# Altium PCB Mach_dk.PcbDoc
Units mm, origin at the board's own origin, x right, y up, seen from the top; angles counter-clockwise.
Board outline 90.04 x 73.02 mm, 2 copper layers (Top Layer, Bottom Layer); 94 components, 80 nets, 252 pads, 4 vias.
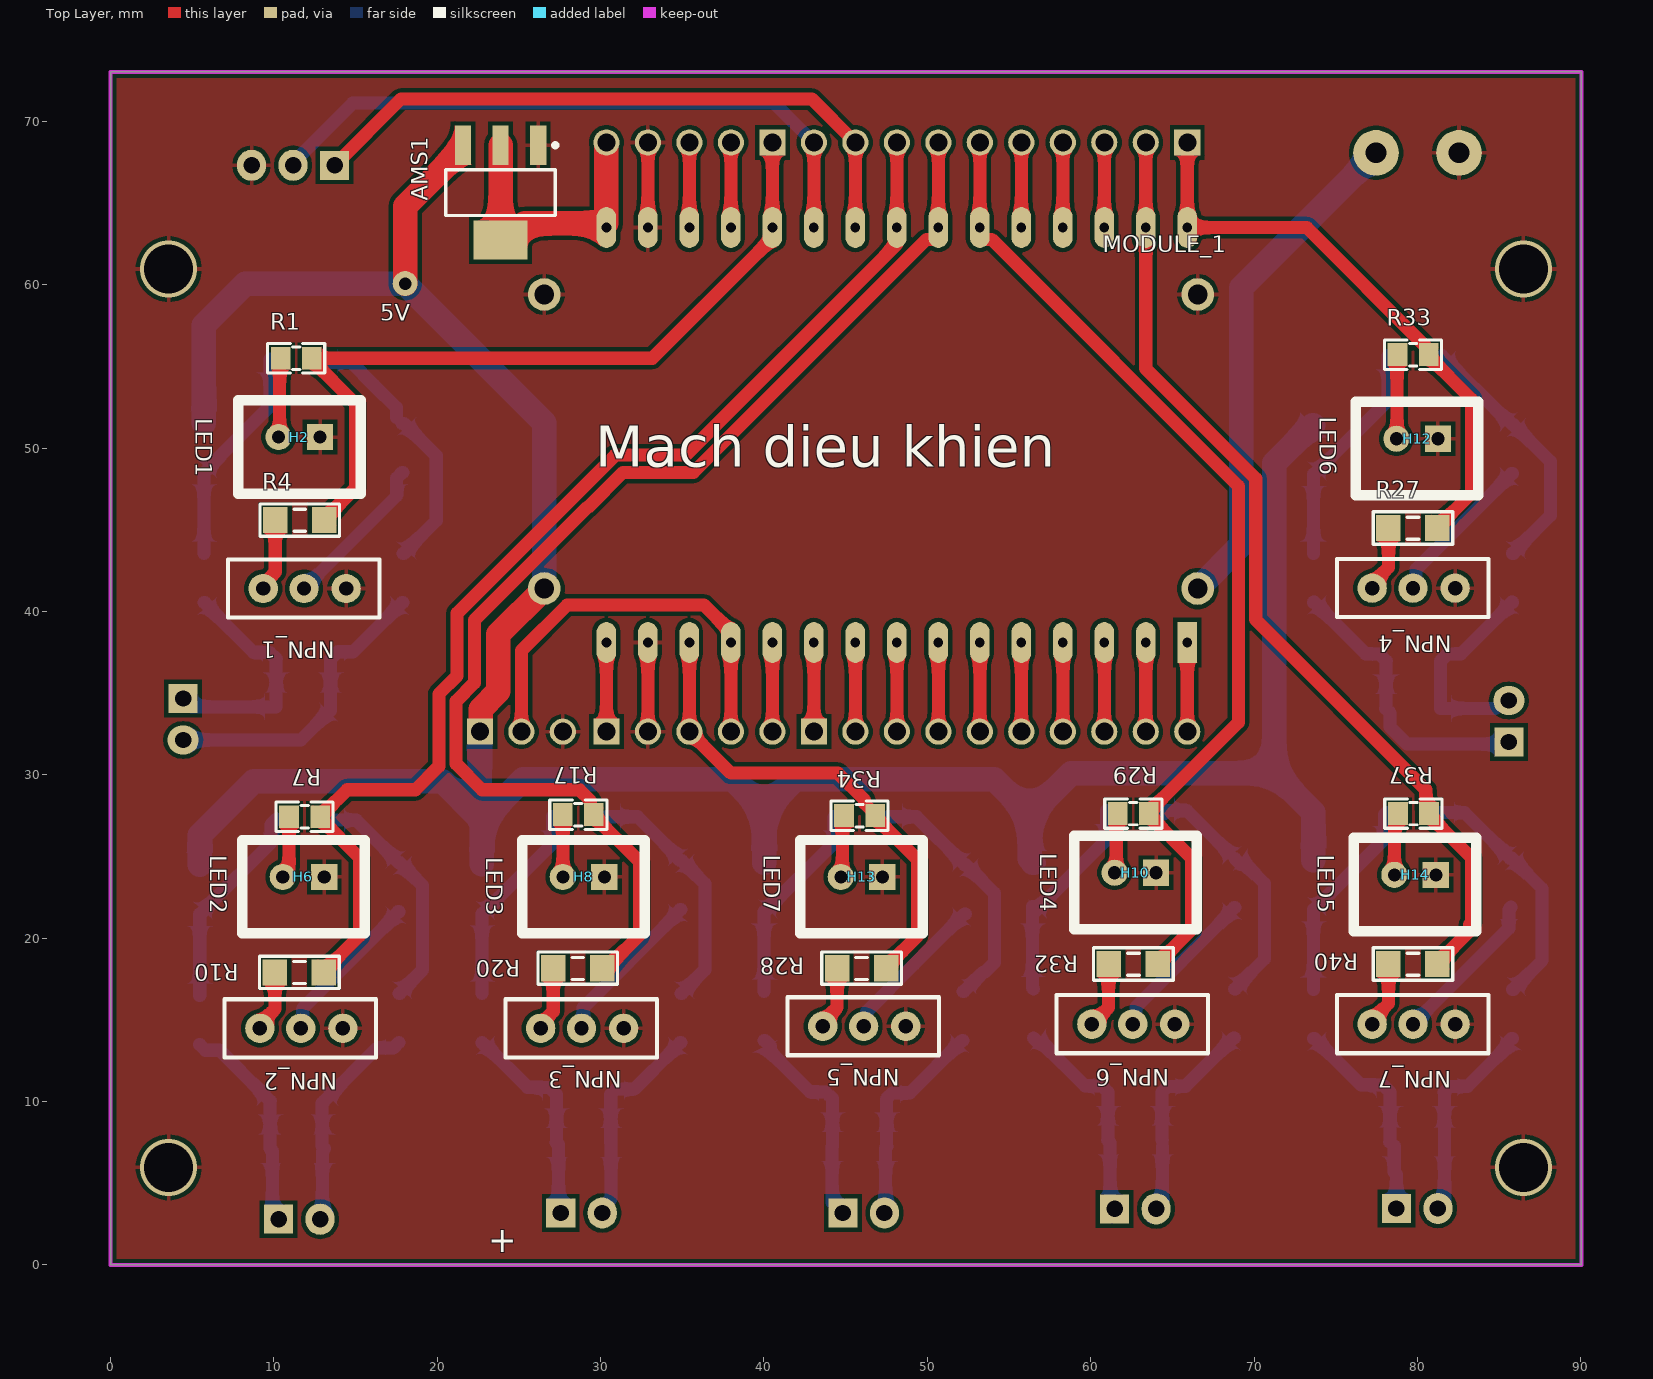
[diagram p0: Top Layer view]
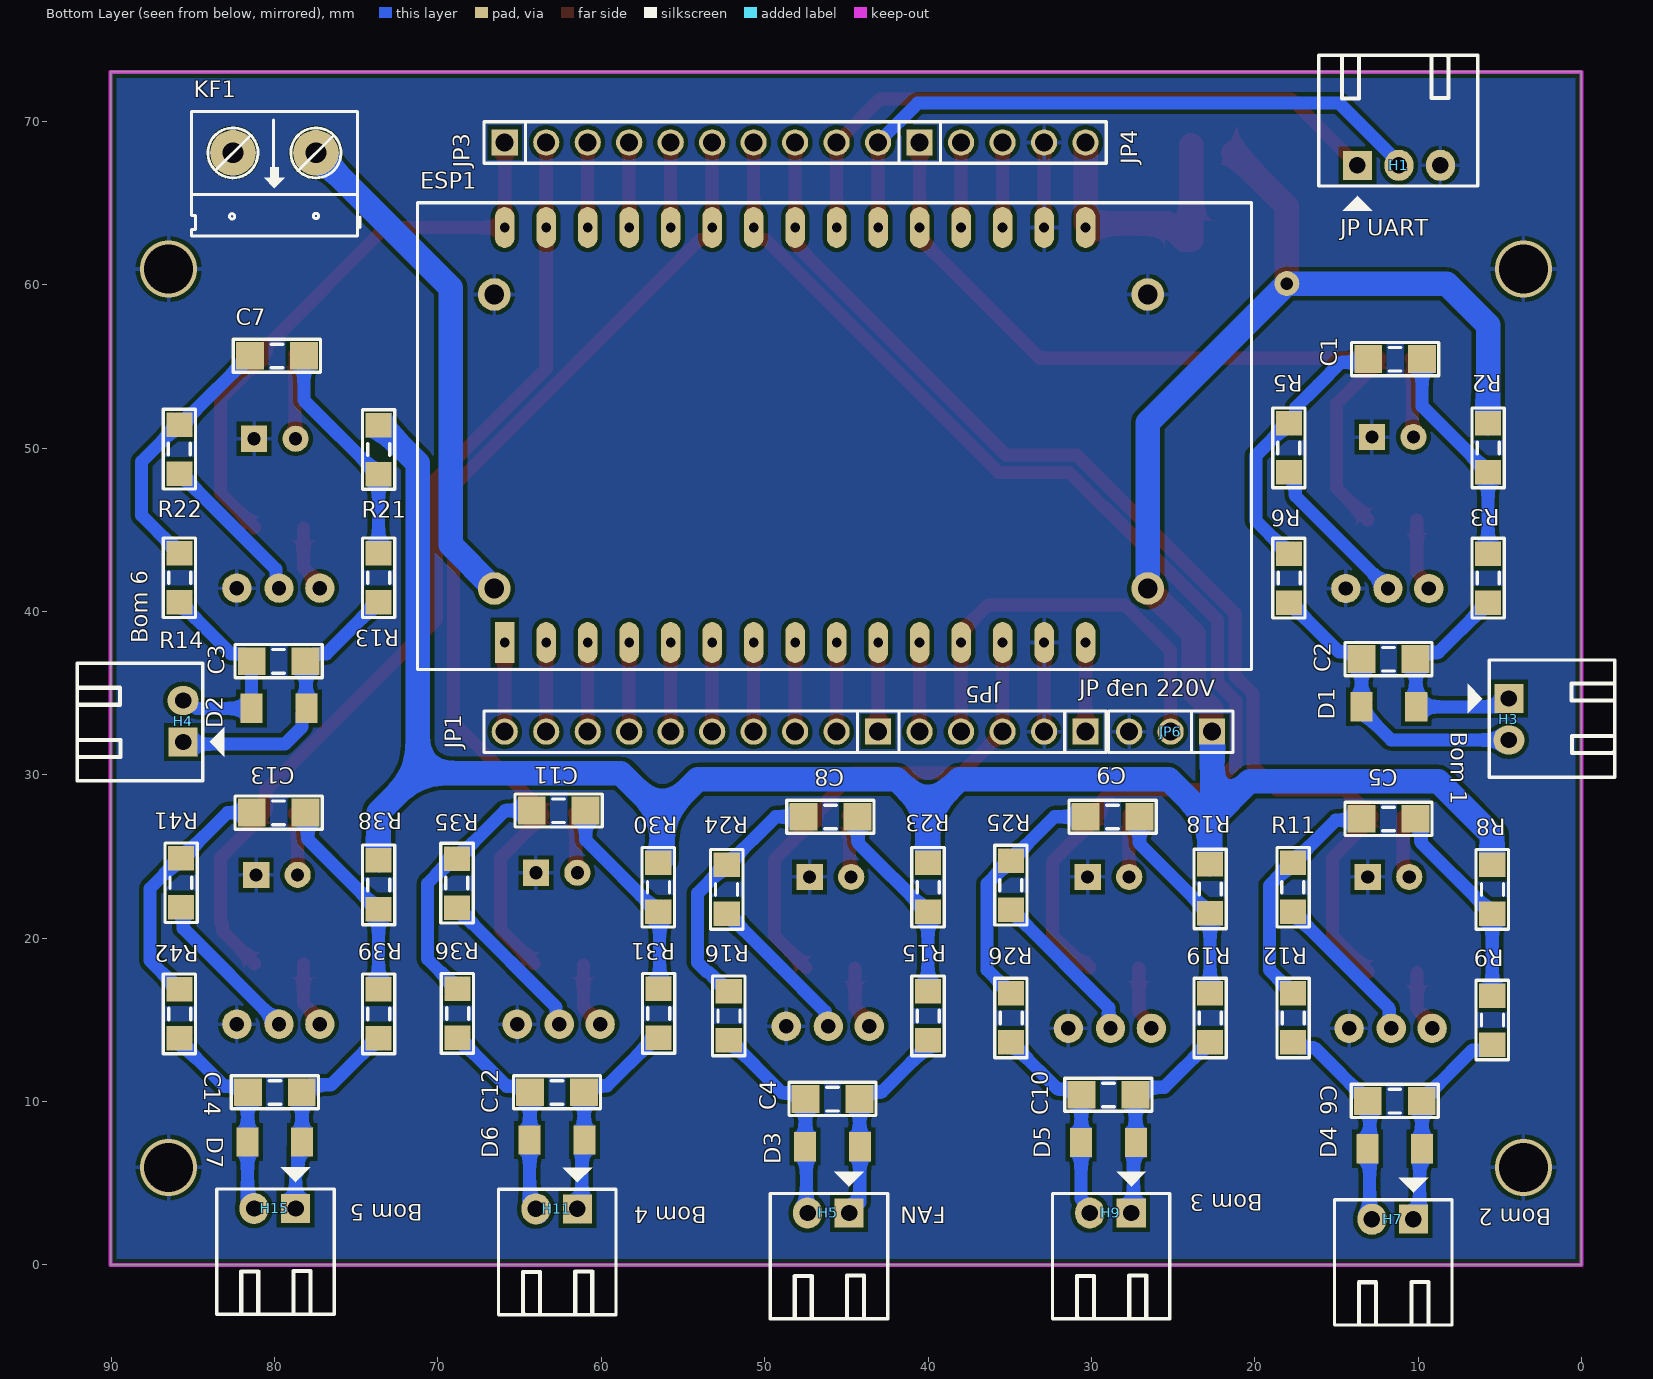
[diagram p1: Bottom Layer view, seen from below]
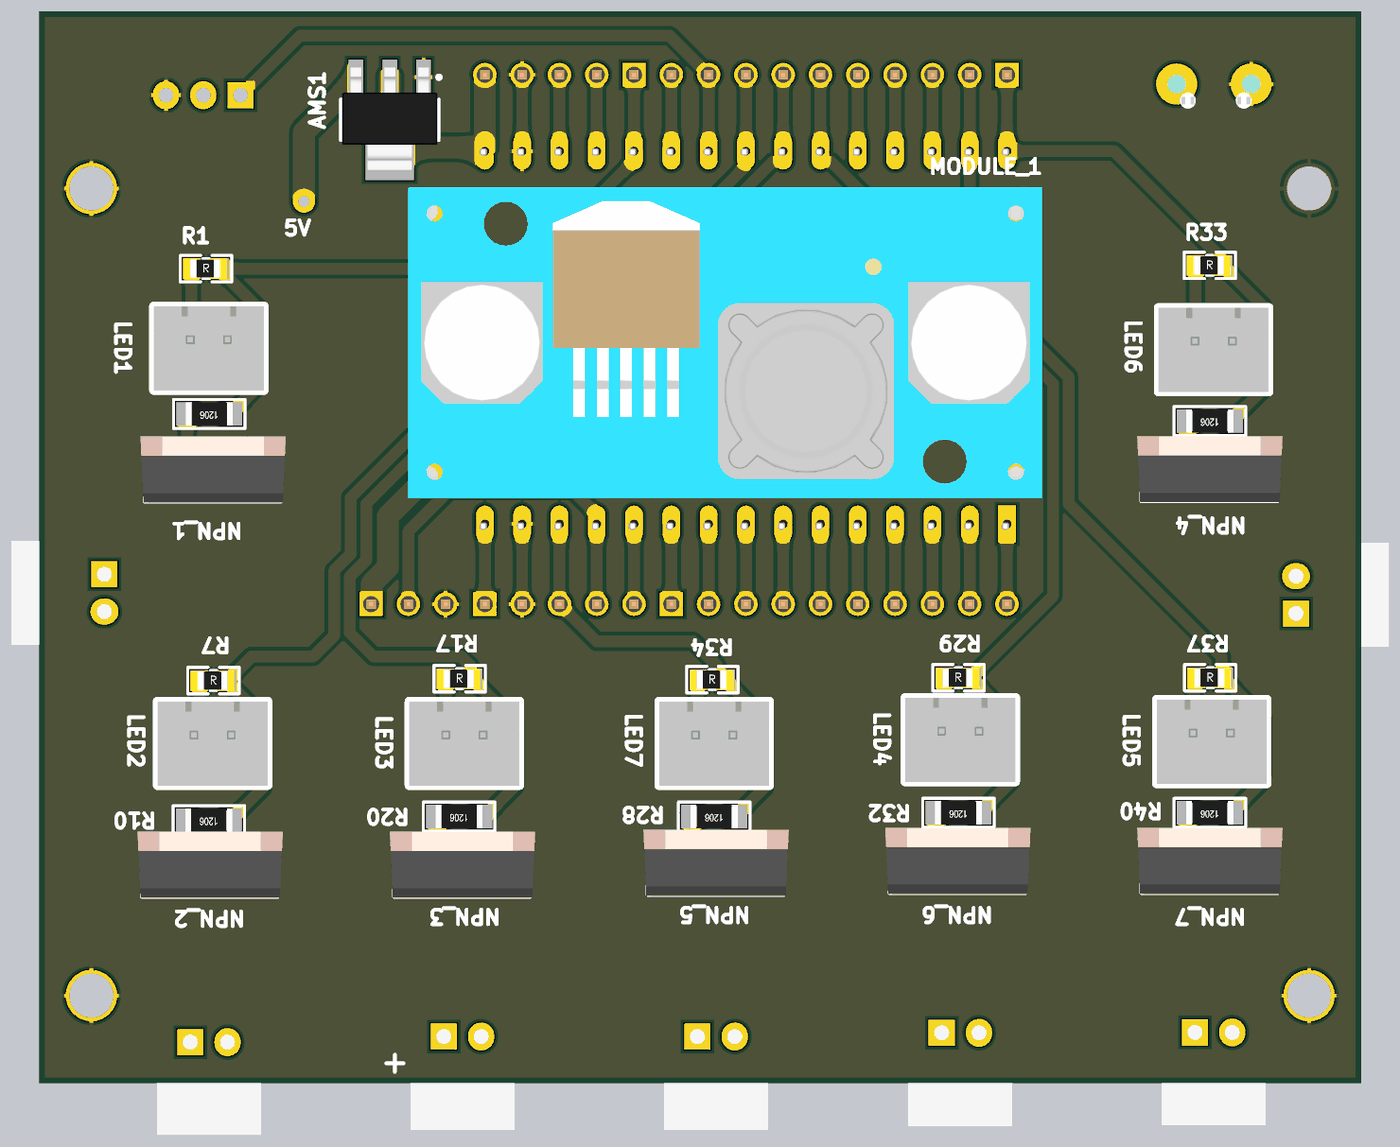
[diagram p2: 3D render of the assembled board from above, using the file's embedded part models]
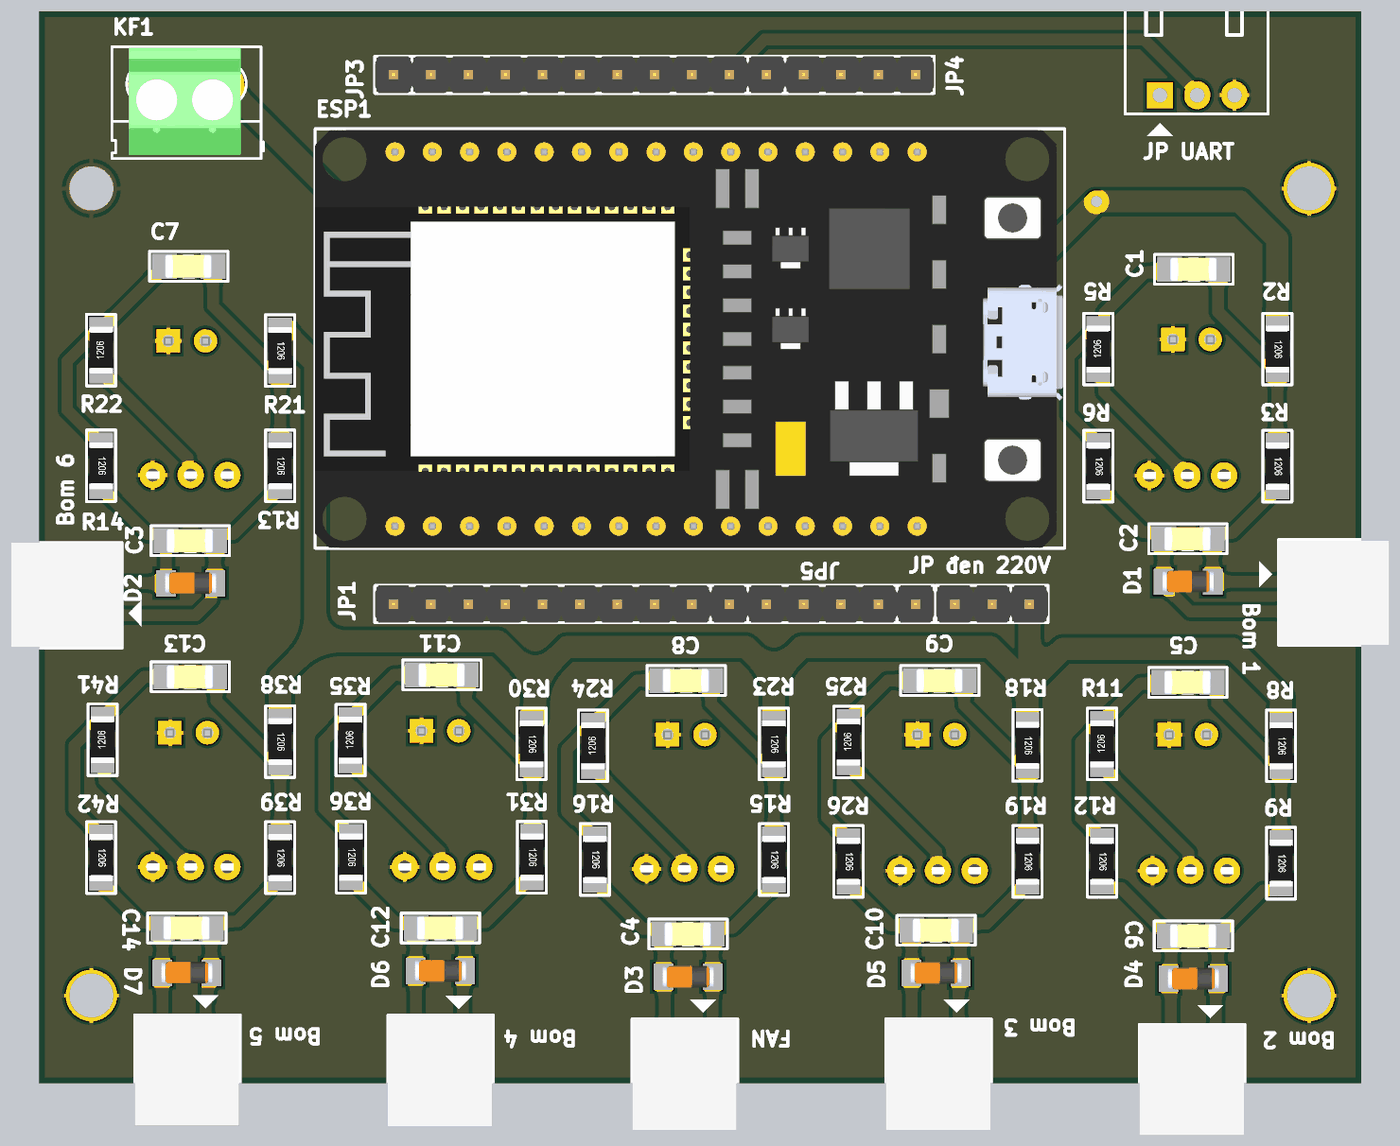
[diagram p3: 3D render of the assembled board from below, using the file's embedded part models]

## Layer stack, top to bottom
Top Solder: solder mask 0.0102, Solder Resist, Dk 3.5
Top Layer: signal copper 0.0356
Dielectric 1: dielectric 0.32, FR-4, Dk 4.8
Bottom Layer: signal copper 0.0356
Bottom Solder: solder mask 0.0102, Solder Resist, Dk 3.5

## Board outline
0,0 0,73.025 90.043,73.025 90.043,0

## Design rules (kind name [scope] priority, off if disabled: settings)
Clearance [All] p1: gap=0.254 ignorepadtopadclearanceinfootprint=FALSE
PolygonConnect [All] p1: connectstyle=Relief reliefconductorwidth=0.254 reliefentries=4 polygonreliefangle="90 Angle" airgapwidth=0.254
RoomDefinition Mach_sche [InComponentClass('Mach_sche')] p1: confinementstyle=ConfineIn formatcopy=TRUE lockcomponents=FALSE outline -5.842,-2.286 96.393,-2.286 96.393,74.041 -5.842,74.041
RoutingVias [All] p1: holewidth=0.711 width=1.27 viastyle="Through Hole" minholewidth=0.711 minwidth=1.27 maxholewidth=0.711 maxwidth=1.27
SolderMaskExpansion [All] p1: expansion=0.102 istentingtop=FALSE
Width 12V [InNet('12V')] p1: maxlimit=1.5 minlimit=0.5 preferedwidth=1
Width 5V [InNet('5V')] p2: maxlimit=1.5 minlimit=0.5 preferedwidth=1
Width 3V3 [InNet('3V3')] p3: maxlimit=1.5 minlimit=0.5 preferedwidth=1
Width all [All] p4: maxlimit=0.8 minlimit=0.3 preferedwidth=0.5
30 further rules are at their usual default settings.

## Components (designator, comment, footprint, x,y, rotation, side; value= is the part's Value field where it differs from the comment)
AMS1 "AMS1117-3.3V" SOT223 23.876,65.638 r180 top value="AMS1117-3.3V SOT223"
C1 "104" "tu 1206" 11.403,55.448 r0 bottom
C2 "104" "tu 1206" 11.812,37.084 r0 bottom
C3 "104" "tu 1206" 79.756,36.957 r0 bottom
C4 "104" "tu 1206" 45.847,10.16 r0 bottom
C5 "104" "tu 1206" 11.812,27.305 r0 bottom
C6 "104" "tu 1206" 11.43,10.033 r0 bottom
C7 "104" "tu 1206" 79.858,55.651 r0 bottom
C8 "104" "tu 1206" 45.975,27.432 r0 bottom
C9 "104" "tu 1206" 28.703,27.432 r0 bottom
C10 "104" "tu 1206" 28.956,10.414 r0 bottom
C11 "104" "tu 1206" 62.611,27.813 r0 bottom
C12 "104" "tu 1206" 62.713,10.566 r0 bottom
C13 "104" "tu 1206" 79.756,27.686 r0 bottom
C14 "104" "tu 1206" 79.985,10.566 r0 bottom
D1 "12V" "DIODE ZENNER SMD SOD80" 11.787,34.163 r0 bottom
D2 "12V" "DIODE ZENNER SMD SOD80" 79.731,34.061 r0 bottom
D3 "12V" "DIODE ZENNER SMD SOD80" 45.847,7.239 r0 bottom
D4 "12V" "DIODE ZENNER SMD SOD80" 11.43,7.112 r0 bottom
D5 "12V" "DIODE ZENNER SMD SOD80" 28.956,7.493 r0 bottom
D6 "12V" "DIODE ZENNER SMD SOD80" 62.713,7.645 r0 bottom
D7 "12V" "DIODE ZENNER SMD SOD80" 79.985,7.518 r0 bottom
ESP1 "ESP32 DEVKIT" "ESP32 WROOM 32 KIT" 65.913,38.1 r90 bottom
H1 "JP UART" "Header 3P DC 2.54" 13.716,67.31 r90 bottom
H2 "LED1" XH2.54M-2 12.827,50.673 r180 top
H3 "Bom 1" "Header 2P DC 2.54" 4.445,34.671 r180 bottom
H4 "Bom 6" "Header 2P DC 2.54" 85.598,32.004 r0 bottom
H5 "FAN" "Header 2P DC 2.54" 44.831,3.175 r270 bottom
H6 "LED2" XH2.54M-2 13.081,23.749 r180 top
H7 "Bom 2" "Header 2P DC 2.54" 10.287,2.794 r270 bottom
H8 "LED3" XH2.54M-2 30.226,23.749 r180 top
H9 "Bom 3" "Header 2P DC 2.54" 27.559,3.175 r270 bottom
H10 "LED4" XH2.54M-2 64.008,24.003 r180 top
H11 "Bom 4" "Header 2P DC 2.54" 61.468,3.429 r270 bottom
H12 "LED6" XH2.54M-2 81.255,50.571 r180 top
H13 "LED7" XH2.54M-2 47.244,23.749 r180 top
H14 "LED5" XH2.54M-2 81.128,23.876 r180 top
H15 "Bom 5" "Header 2P DC 2.54" 78.715,3.454 r270 bottom
JP1 "JP 1x10 2.54" "JP 1x10 DT" 43.053,32.639 r0 bottom
JP3 "JP 1x10 2.54" "JP 1x10 DT" 65.913,68.707 r180 bottom
JP4 "JP 1x5 2.54" "JP 1x5 DT" 40.513,68.707 r180 bottom
JP5 "JP 1x5 2.54" "JP 1x5 DT" 30.353,32.639 r0 bottom
JP6 "JP đen 220V" "JP 1x3 DT" 22.606,32.639 r0 bottom
KF1 "CON 2 KF301" "Con 2 KF301 5.08" 77.47,68.072 r0 bottom
MODULE_1 "LM2596HVS_MODULE" LM2596HVS_MODULE 66.548,59.402 r270 top
NPN_1 "Trans 2SD882M SOT-252" Trans_2SD882_DIP 9.343,41.402 r0 top
NPN_2 "Trans 2SD882M SOT-252" Trans_2SD882_DIP 9.144,14.478 r0 top
NPN_3 "Trans 2SD882M SOT-252" Trans_2SD882_DIP 26.329,14.478 r0 top
NPN_4 "Trans 2SD882M SOT-252" Trans_2SD882_DIP 77.231,41.427 r0 top
NPN_5 "Trans 2SD882M SOT-252" Trans_2SD882_DIP 43.601,14.605 r0 top
NPN_6 "Trans 2SD882M SOT-252" Trans_2SD882_DIP 60.071,14.732 r0 top
NPN_7 "Trans 2SD882M SOT-252" Trans_2SD882_DIP 77.231,14.732 r0 top
R1 "330R" "Tro SMD 0805" 11.365,55.56 r0 top
R2 "L3" "tro smd 1206" 5.715,50.014 r270 bottom
R3 "L4" "tro smd 1206" 5.715,42.037 r270 bottom
R4 "100R" "tro smd 1206" 11.581,45.593 r180 top
R5 "L6" "tro smd 1206" 17.907,50.014 r90 bottom
R6 "L7" "tro smd 1206" 17.907,42.037 r270 bottom
R7 "330R" "Tro SMD 0805" 11.873,27.493 r0 top
R8 "L3" "tro smd 1206" 5.461,22.987 r270 bottom
R9 "L4" "tro smd 1206" 5.461,14.986 r270 bottom
R10 "100R" "tro smd 1206" 11.557,17.907 r180 top
R11 "L6" "tro smd 1206" 17.653,23.114 r90 bottom
R12 "L7" "tro smd 1206" 17.653,15.113 r270 bottom
R13 "L4" "tro smd 1206" 73.635,42.062 r270 bottom
R14 "L7" "tro smd 1206" 85.827,42.062 r270 bottom
R15 "L4" "tro smd 1206" 40.005,15.24 r270 bottom
R16 "L7" "tro smd 1206" 52.197,15.24 r270 bottom
R17 "330R" "Tro SMD 0805" 28.637,27.62 r0 top
R18 "L3" "tro smd 1206" 22.733,23.011 r270 bottom
R19 "L4" "tro smd 1206" 22.733,15.113 r270 bottom
R20 "100R" "tro smd 1206" 28.599,18.161 r180 top
R21 "L3" "tro smd 1206" 73.635,49.912 r270 bottom
R22 "L6" "tro smd 1206" 85.827,49.936 r90 bottom
R23 "L3" "tro smd 1206" 40.005,23.114 r270 bottom
R24 "L6" "tro smd 1206" 52.324,22.987 r90 bottom
R25 "L6" "tro smd 1206" 34.925,23.241 r90 bottom
R26 "L7" "tro smd 1206" 34.925,15.113 r270 bottom
R27 "100R" "tro smd 1206" 79.731,45.11 r180 top
R28 "100R" "tro smd 1206" 45.974,18.161 r180 top
R29 "330R" "Tro SMD 0805" 62.611,27.686 r0 top
R30 "L3" "tro smd 1206" 56.515,23.114 r270 bottom
R31 "L4" "tro smd 1206" 56.49,15.392 r270 bottom
R32 "100R" "tro smd 1206" 62.611,18.415 r180 top
R33 "330R" "Tro SMD 0805" 79.731,55.778 r0 top
R34 "330R" "Tro SMD 0805" 45.847,27.559 r0 top
R35 "L6" "tro smd 1206" 68.834,23.368 r90 bottom
R36 "L7" "tro smd 1206" 68.809,15.392 r270 bottom
R37 "330R" "Tro SMD 0805" 79.756,27.686 r0 top
R38 "L3" "tro smd 1206" 73.635,23.265 r270 bottom
R39 "L4" "tro smd 1206" 73.635,15.367 r270 bottom
R40 "100R" "tro smd 1206" 79.731,18.415 r180 top
R41 "L6" "tro smd 1206" 85.725,23.392 r90 bottom
R42 "L7" "tro smd 1206" 85.827,15.367 r270 bottom

## Footprints (in the part's own frame and the unit in brackets; to place one, negate y for a bottom-side part, rotate by r counter-clockwise, add the part's x,y. Pads: shape width x height; smd on the part's side, far side on the other; paste and mask are expansions set on the pad)
"Con 2 KF301 5.08" [mil]
  round 110 hole 50: 1(0,0) 2(200,0)
  silkscreen extent -106,-100 300,200, body extent -45,-97 255,190, height 335
"DIODE ZENNER SMD SOD80" [mm] "SOD80"
  rect 1.35x1.8 smd: 1(1.675,0) 2(-1.675,0)
  body extent -1.75,-0.76 1.75,0.74, height 1.45
"ESP32 WROOM 32 KIT" [mm]
  rect 2.5x1.2 hole 0.6: 1(0,0)
  oval 2.5x1.2 hole 0.6: 2(0,-2.54) 3(0,-5.08) 4(0,-7.62) 5(0,-10.16) 6(0,-12.7) 7(0,-15.24) 8(0,-17.78) 9(0,-20.32) 10(0,-22.86) 11(0,-25.4) 12(0,-27.94) 13(0,-30.48) 14(0,-33.02) 15(0,-35.56) 16(25.4,-35.56) 17(25.4,-33.02) 18(25.4,-30.48) 19(25.4,-27.94) 20(25.4,-25.4) 21(25.4,-22.86) 22(25.4,-20.32) 23(25.4,-17.78) 24(25.4,-15.24) 25(25.4,-12.7) 26(25.4,-10.16) 27(25.4,-7.62) 28(25.4,-5.08) 29(25.4,-2.54) 30(25.4,0)
  silkscreen extent -1.65,-45.72 26.92,5.33, body extent -1.65,-45.6 26.85,5.33, height 10.49
"Header 2P DC 2.54" [mil]
  rect 70x70 hole 39.37: 1(0,0)
  oval 75x70 hole 39.37: 2(0,-100)
  silkscreen extent -100,-190 255,93, body extent -50,-190 250,90, height 237
"Header 3P DC 2.54" [mil]
  rect 70x70 hole 39.37: 1(0,0)
  oval 75x70 hole 39.37: 2(0,-100) 3(0,-200)
  silkscreen extent -110,-290 265,93
"JP 1x3 DT" [mm]
  rect 1.6x1.6 hole 1.1: 1(0,0)
  round 1.6 hole 1.1: 2(2.54,0) 3(5.08,0)
  silkscreen extent -1.27,-1.27 6.35,1.27, body extent -1.27,-1.27 6.35,1.27, height 8.54
"JP 1x5 DT" [mm] "5 pins, 1 row, straight, gold plating"
  rect 1.6x1.6 hole 1.1: 1(0,0)
  round 1.6 hole 1.1: 2(2.54,0) 3(5.08,0) 4(7.62,0) 5(10.16,0)
  silkscreen extent -1.27,-1.27 11.43,1.27, body extent -1.27,-1.27 11.43,1.27, height 8.54
"JP 1x10 DT" [mm] "10 pins, 1 row, straight, gold plating"
  rect 1.6x1.6 hole 1.1: 1(0,0)
  round 1.6 hole 1.1: 2(2.54,0) 3(5.08,0) 4(7.62,0) 5(10.16,0) 6(12.7,0) 7(15.24,0) 8(17.78,0) 9(20.32,0) 10(22.86,0)
  silkscreen extent -1.27,-1.27 24.13,1.27, body extent -1.27,-1.27 24.13,1.27, height 8.54
LM2596HVS_MODULE [mm]
  round 2 hole 1.2: 1(0,0) 2(18,0) 3(0,-40) 4(18,-40)
  body extent -1.65,-41.42 19.55,1.78, height 13.5
SOT223 [mm]
  rect 1x2.4 smd: 1(-2.3,-2.9) 2(0,-2.9) 3(2.3,-2.9)
  rect 3.3x2.4 smd: 4(0,2.9)
  silkscreen extent -3.48,-3.02 3.35,1.4, body extent -3.25,-3.56 3.25,3.4, height 1.68
Trans_2SD882_DIP [mm]
  round 1.8 hole 0.88: 1(0,0) 2(2.5,0) 3(5.08,0)
  silkscreen extent -2.16,-1.78 7.11,1.78, body extent -2.45,-1.85 7.45,2.65, height 24.1
"Tro SMD 0805" [mm]
  rect 1.2x1.4 smd: 1(-0.946,-0.061) 2(0.954,-0.061)
  silkscreen extent -1.75,-0.97 1.75,0.84, body extent -1.56,-0.76 1.44,0.64, height 0.53
"tro smd 1206" [mm]
  rect 1.5x1.6 smd: 1(-1.5,0) 2(1.5,0)
  silkscreen extent -2.44,-0.99 2.44,0.99, body extent -1.6,-0.8 1.6,0.8, height 0.6
"tu 1206" [mm]
  rect 1.7x1.7 smd: 1(-1.65,0) 2(1.65,0)
  silkscreen extent -2.67,-1.02 2.67,1.02, body extent -1.57,-0.8 1.63,0.8, height 0.94
XH2.54M-2 [mm]
  rect 1.6x1.6 hole 0.8: 1(0,0)
  round 1.6 hole 0.8: 2(2.54,0)
  silkscreen extent -2.48,-2.26 5.02,3.46, body extent -2.48,-2.26 5.02,3.48, height 6.91

## Part data
AMS1: library part "AMS1117 SMD", "Dán", Chung_Loai=Dán, Don_Vi=Con, Ma_Hang=MH000596
C1 C2 C3 C4 C5 C6 C7 C8 C9 C10 C11 C12 C13 C14: library part "Tu 1206 104 50V 20%", "Dán", Chung_Loai=Dán, Don_Vi=Con, Ma_Hang=MH004544, So_Chan=2, Ten_Linh_Kien="Tụ 1206 104-0.1uF 20% 50V"
D1 D2 D3 D4 D5 D6 D7: library part "Diode Zener 12V", "Dán", Chung_Loai=Dán, Don_Vi=Con, Ma_Hang=MH000945, Ten_Linh_Kien="Diode Zener 1/2W 12V SMD1206 ZMM12"
ESP1: library part "ESP32 WROOM 32 KIT"
H1: library part "Header 3P 2.54 Duc Cong", "Cắm", Chung_Loai=Cắm, Don_Vi=Con, Ma_Hang=MH001302, Ten_Linh_Kien="Header 3P XH2.54-3P Đực Cong"
H2 H6 H8 H10 H12 H13 H14: library part "Header 2P 2.54 Duc Thang", "Cắm", Chung_Loai=Cắm, Don_Vi=Con, Ma_Hang=MH001283, Ten_Linh_Kien="Header 2P XH2.54-2P Đực Thẳng"
H3 H4 H5 H7 H9 H11 H15: library part "Header 2P 2.54 Duc Cong", "Cắm", Chung_Loai=Cắm, Don_Vi=Con, Ma_Hang=MH002852, Ten_Linh_Kien="Header 2P XH2.54-2P Đực Cong"
JP1 JP3: library part "JP 1x10 2.54 Duc Thang", "Cắm", Chung_Loai=Cắm, Don_Vi=Con, Ma_Hang=MH000903, Ten_Linh_Kien="Jump Đơn Đực 2.54MM 1x40P Thẳng 11MM"
JP4 JP5: library part "JP 1x5 2.54 Duc Thang", "Cắm", Chung_Loai=Cắm, Don_Vi=Con, Ma_Hang=MH000903, Ten_Linh_Kien="Jump Đơn Đực 2.54MM 1x40P Thẳng 11MM"
JP6: library part "JP 1x3 2.54 Duc Thang", "Cắm", Chung_Loai=Cắm, Don_Vi=Con, Ma_Hang=MH000903, Ten_Linh_Kien="Jump Đơn Đực 2.54MM 1x40P Thẳng 11MM"
KF1: "Cắm", Chung_Loai=Cắm, Don_Vi=Con, Ma_Hang=MH000987, Ten_Linh_Kien="CON 2 KF301-2P 5.08MM Xanh Dương"
R1 R7 R17 R29 R33 R34 R37: library part "Tro 0805 5% 330R", "Dán", Chung_Loai=Dán, Don_Vi=Con, Ma_Hang=MH005337, So_Chan=2, Ten_Linh_Kien="Trở 0805 5% 330R"
R2 R3 R5 R6 R8 R9 R11 R12 R13 R14 R15 R16 R18 R19 R21 R22 R23 R24 R25 R26 R30 R31 R35 R36 R38 R39 R41 R42: library part "Tro 1206 1% 200R", "Dán", Chung_Loai=Dán, Don_Vi=Con, Ma_Hang=MH005895, So_Chan=2, Ten_Linh_Kien="Trở 1206 1% 200R"
R4 R10 R20 R27 R28 R32 R40: library part "Tro 1206 1% 100R", "Dán", Chung_Loai=Dán, Don_Vi=Con, Ma_Hang=MH005891, So_Chan=2, Ten_Linh_Kien="Trở 1206 1% 100R"

## Free pads (board coordinates)
  round 1.524 hole 0.762: ""(18.034,60.071)

## Via types
v1: diameter 3.5, hole 3, Top Layer to Bottom Layer, 3 vias
v2: diameter 3.5, hole 3, Top Layer to Bottom Layer, tented both sides, 1 vias

## Nets (pads, with @x,y where several pads share a name; then routed paths per layer and width w, separated by ;. In a path a pad name is that pad's centre, name@x,y a point inside that pad or via, vN(x,y) a via of type N, cw(c..) or ccw(c..) an arc to the next point about the centre after c; other vN are vias at no path point)
3V3: AMS1.2 AMS1.4 ESP1.16 JP4.5 | length 17.7
  Top Layer w1.5: AMS1.2 AMS1.4 24.326,62.738 25.342,63.754 30.353,63.754 JP4.5
5V: AMS1.3 JP6.1 MODULE_1.4 pad. R2.1 R8.1 R18.1 R21.1 R23.1 R30.1 R38.1 | length 179
  Top Layer w1.5: pad. 18.034,64.796 AMS1.3@21.326,68.088 ; JP6.1 22.656,32.689 22.656,34.026 23.742,35.112 23.742,38.596 MODULE_1.4
  Bottom Layer w1.5: R8.1 5.461,26.299 7.874,28.712 8.753,29.591 20.32,29.591 22.606,27.305 ; R2.1 5.715,57.531 8.255,60.071 pad. 26.548,51.557 MODULE_1.4 ; 22.606,27.178 22.606,27.305 ; JP6.1 22.606,27.305 ; R18.1 22.733,27.178 ; R23.1 40.005,27.813 ; R30.1 56.465,24.614 56.465,24.664 56.261,24.868 56.261,27.559 ; R38.1 73.635,27.711 71.247,30.099 ; R21.1 73.585,51.412 71.247,49.075 71.247,30.099 ; 22.606,27.305 22.733,27.178 ; 22.733,27.178 25.273,29.718 38.1,29.718 40.005,27.813 ; 40.005,27.813 41.91,29.718 54.102,29.718 56.261,27.559 ; 56.261,27.559 58.801,30.099 71.247,30.099
12V: KF1.1 MODULE_1.2 | length 31.2
  Bottom Layer w1.5: MODULE_1.2 69.215,44.069 69.215,59.817 KF1.1
D2: ESP1.19 JP4.2 | length 5
  Top Layer w0.8: ESP1.19@37.973,63.754 JP4.2
D4: ESP1.20 JP4.1 R1.2 R4.1 | length 48.6
  Top Layer w0.8: R4.1 13.081,45.643 14.986,47.548 14.986,52.732 12.319,55.399 R1.2 33.162,55.499 40.513,62.85 ESP1.20 ; ESP1.20@40.513,63.754 JP4.1
D5: ESP1.23 JP3.8 R7.2 R10.1 | length 72.1
  Top Layer w0.8: R10.1 13.057,17.957 15.24,20.14 15.24,24.919 12.827,27.332 12.827,27.532 13.027,27.732 13.127,27.732 14.478,29.083 18.669,29.083 20.098,30.512 20.098,34.944 21.216,36.062 21.216,39.9 30.884,49.568 35.217,49.568 48.056,62.407 48.056,63.423 ESP1.23 ; ESP1.23@48.133,63.754 JP3.8
D12: ESP1.12 JP5.4 JP6.2 | length 25.7
  Top Layer w0.8: JP6.2 25.146,37.592 27.94,40.386 36.337,40.386 37.973,38.75 ESP1.12 JP5.4
D13: ESP1.13 JP5.3 R28.1 R34.2 | length 30.5
  Top Layer w0.8: ESP1.13@35.433,38.227 ESP1.13 JP5.3 37.973,30.099 44.526,30.099 46.155,28.469 46.155,28.244 46.801,27.598 R34.2 46.801,27.398 49.403,24.797 49.403,20.14 47.474,18.211 R28.1
D14: ESP1.11 JP5.5 | length 5.6
  Top Layer w0.8: JP5.5 ESP1.11@40.513,38.227
D15: ESP1.18 JP4.3 | length 5
  Top Layer w0.8: ESP1.18@35.433,63.754 JP4.3
D18: ESP1.24 JP3.7 R17.2 R20.1 | length 74.8
  Top Layer w0.8: R20.1 30.099,18.211 30.449,18.561 30.753,18.561 32.385,20.193 32.385,24.665 29.591,27.459 R17.2 29.391,27.759 29.391,28.394 28.702,29.083 22.739,29.083 21.152,30.67 21.152,34.507 22.27,35.625 22.27,39.463 29.162,46.355 29.21,46.355 31.369,48.514 35.687,48.514 49.946,62.773 50.488,62.773 50.673,62.958 ESP1.24 ; ESP1.24@50.673,63.627 JP3.7
D19: ESP1.25 JP3.6 R29.2 R32.1 | length 61
  Top Layer w0.8: ESP1.25 53.213,62.958 53.398,62.773 53.94,62.773 69.05,47.663 69.05,33.21 R29.2@63.692,27.852 ; ESP1.25@53.213,63.627 JP3.6 ; R29.2 63.565,27.525 63.692,27.398 66.167,24.924 66.167,20.521 64.111,18.465 R32.1
D21: ESP1.26 JP3.5 | length 5
  Top Layer w0.8: ESP1.26@55.753,63.754 JP3.5
D22: ESP1.29 JP3.2 R37.2 R40.1 | length 59.2
  Top Layer w0.8: ESP1.29 63.373,54.864 70.104,48.133 70.104,39.497 80.51,29.091 80.51,27.825 R37.2 80.71,27.525 83.312,24.924 83.312,20.955 83.185,20.828 83.185,20.419 81.231,18.465 R40.1 ; ESP1.29@63.373,63.754 JP3.2
D23: ESP1.30 JP3.1 R27.1 R33.2 | length 36.9
  Top Layer w0.8: ESP1.30 65.913,63.05 66.098,62.865 66.098,63.5 73.228,63.5 80.485,56.243 80.485,55.918 R33.2 80.685,55.618 83.312,52.991 83.312,47.242 81.231,45.16 R27.1 ; ESP1.30@65.913,63.754 JP3.1
D25: ESP1.8 JP1.3 | length 5.6
  Top Layer w0.8: JP1.3 ESP1.8@48.133,38.227
D26: ESP1.9 JP1.2 | length 5.6
  Top Layer w0.8: JP1.2 ESP1.9@45.593,38.227
D27: ESP1.10 JP1.1 | length 5.6
  Top Layer w0.8: JP1.1 ESP1.10@43.053,38.227
D32: ESP1.6 JP1.5 | length 5.6
  Top Layer w0.8: JP1.5 ESP1.6@53.213,38.227
D33: ESP1.7 JP1.4 | length 5.6
  Top Layer w0.8: JP1.4 ESP1.7@50.673,38.227
D34: ESP1.4 JP1.7 | length 5.6
  Top Layer w0.8: JP1.7 ESP1.4@58.293,38.227
D35: ESP1.5 JP1.6 | length 5.6
  Top Layer w0.8: JP1.6 ESP1.5@55.753,38.227
EN: ESP1.1 JP1.10 | length 5.6
  Top Layer w0.8: JP1.10 ESP1.1@65.913,38.227
GND: AMS1.1 ESP1.14 ESP1.17 H1.3 H2.1 H6.1 H8.1 H10.1 H12.1 H13.1 H14.1 JP4.4 JP5.2 JP6.3 KF1.2 MODULE_1.1 MODULE_1.3 NPN_1.3 NPN_2.3 NPN_3.3 NPN_4.3 NPN_5.3 NPN_6.3 NPN_7.3 | length 10.5
  Top Layer w0.8: JP5.2 ESP1.14@32.893,38.227 ; ESP1.17@32.893,63.754 JP4.4
  other v1: 3.556,5.969 86.487,5.969 3.556,60.96
  other v2: 86.487,60.96
NetC1_1: C1.1 R2.2 R3.1 | length 13.6
  Bottom Layer w0.8: R3.1 R2.2 5.765,48.514 6.115,48.864 6.115,48.914 9.753,52.552 C1.1
NetC1_2: C1.2 R5.2 R6.1 | length 16.1
  Bottom Layer w0.8: C1.2 13.256,55.245 14.732,55.245 16.12,53.857 17.507,52.47 R5.2@17.507,51.864 ; R5.2@17.857,51.514 R5.2 17.957,51.514 19.939,49.532 19.939,45.569 18.307,43.937 18.307,43.887 17.957,43.537 R6.1
NetC2_1: C2.1 D1.2 H3.1 R3.2 | length 14.5
  Bottom Layer w0.8: H3.1 4.953,34.163 D1.2 10.137,34.188 C2.1@10.137,37.109 ; R3.2 5.765,40.537 6.115,40.187 6.115,40.137 8.766,37.486 C2.1@9.76,37.486 ; C2.1@9.961,37.285 C2.1@10.137,37.109 ; C2.1 C2.1@10.137,37.109
NetC2_2: C2.2 D1.1 H3.2 R6.2 | length 18.8
  Bottom Layer w0.8: H3.2 11.655,32.131 13.462,33.938 D1.1 C2.2 13.912,37.534 14.854,37.534 17.857,40.537 R6.2
NetC3_1: C3.1 D2.2 H4.1 R13.2 | length 17.9
  Bottom Layer w0.8: R13.2 73.685,40.562 76.84,37.407 77.656,37.407 C3.1 78.081,36.932 78.081,34.087 D2.2 78.331,33.786 78.331,32.921 79.375,31.877 85.471,31.877 H4.1
NetC3_2: C3.2 D2.1 H4.2 R14.2 | length 13.2
  Bottom Layer w0.8: H4.2 85.27,34.544 84.787,34.061 D2.1 C3.2 81.856,37.407 82.671,37.407 85.427,40.162 85.427,40.212 85.777,40.562 R14.2
NetC4_1: C4.1 D3.2 H5.1 R15.2 | length 12.9
  Bottom Layer w0.8: R15.2 40.055,13.74 40.405,13.39 40.405,13.001 42.823,10.583 C4.1@43.774,10.583 ; C4.1@43.986,10.371 C4.1@44.185,10.172 ; C4.1 C4.1@44.185,10.172 ; H5.1 44.172,3.834 D3.2 44.185,7.252 C4.1@44.185,10.172
NetC4_2: C4.2 D3.1 H5.2 R16.2 | length 13.2
  Bottom Layer w0.8: H5.2 47.447,3.251 47.447,7.164 D3.1 47.51,7.251 47.51,10.147 C4.2 47.861,10.524 48.931,10.524 52.147,13.74 R16.2
NetC5_1: C5.1 R8.2 R9.1 | length 12.8
  Bottom Layer w0.8: R9.1 R8.2 5.511,21.487 5.861,21.837 5.861,21.887 9.822,25.848 9.822,26.965 C5.1
NetC5_2: C5.2 R11.2 R12.1 | length 14.6
  Bottom Layer w0.8: C5.2 13.543,27.224 15.043,27.224 R11.2 17.703,24.614 19.107,23.21 19.107,18.067 18.053,17.013 18.053,16.963 17.703,16.613 R12.1
NetC6_1: C6.1 D4.2 H7.1 R9.2 | length 13.2
  Bottom Layer w0.8: R9.2 5.811,13.136 6.677,13.136 9.33,10.483 C6.1 9.768,10.021 9.768,7.125 D4.2 9.906,6.961 9.906,3.175 H7.1
NetC6_2: C6.2 D4.1 H7.2 R12.2 | length 13.5
  Bottom Layer w0.8: H7.2 12.966,2.933 12.966,6.973 D4.1 12.954,7.263 12.954,9.907 C6.2 16.333,13.286 17.326,13.286 R12.2
NetC7_1: C7.1 R13.1 R21.2 | length 14
  Bottom Layer w0.8: R13.1 R21.2 73.685,48.412 78.208,52.935 C7.1
NetC7_2: C7.2 R14.1 R22.2 | length 15.9
  Bottom Layer w0.8: C7.2 85.373,51.786 85.477,51.786 R22.2 85.877,51.436 88.138,49.175 88.138,45.874 86.227,43.962 86.227,43.912 85.877,43.562 R14.1
NetC8_1: C8.1 R15.1 R23.2 | length 12.5
  Bottom Layer w0.8: R15.1 R23.2 40.055,21.614 44.292,25.851 44.292,27.399 C8.1
NetC8_2: C8.2 R16.1 R24.2 | length 15.3
  Bottom Layer w0.8: C8.2 49.329,27.432 52.274,24.487 R24.2 52.324,24.511 52.35,24.511 54.102,22.759 54.102,18.503 53.536,17.937 53.444,17.937 52.247,16.74 R16.1
NetC9_1: C9.1 R18.2 R19.1 | length 12.7
  Bottom Layer w0.8: R19.1 22.733,21.461 R18.2@22.783,21.511 ; R18.2 R18.2@22.783,21.511 ; C9.1 27.053,25.781 R18.2@22.783,21.511
NetC9_2: C9.2 R25.2 R26.1 | length 15.1
  Bottom Layer w0.8: C9.2 32.258,27.432 34.525,25.165 34.525,25.091 34.875,24.741 34.975,24.741 36.379,23.337 36.379,18.067 35.325,17.013 35.325,16.963 34.975,16.613 R26.1
NetC10_1: C10.1 D5.2 H9.1 R19.2 | length 13.3
  Bottom Layer w0.8: R19.2 22.733,13.589 22.86,13.462 22.934,13.462 25.532,10.864 26.856,10.864 C10.1@27.294,10.426 ; D5.2 D5.2@27.294,7.506 ; C10.1@27.281,10.439 C10.1@27.294,10.427 ; C10.1 C10.1@27.294,10.427 ; H9.1 27.42,3.314 27.42,7.379 D5.2@27.294,7.506 ; D5.2@27.294,7.506 C10.1@27.294,10.426
NetC10_2: C10.2 D5.1 H9.2 R26.2 | length 13.1
  Bottom Layer w0.8: H9.2 30.099,3.503 30.631,4.035 D5.1 30.619,7.505 30.619,10.401 C10.2 30.945,10.753 32.065,10.753 34.525,13.213 34.525,13.263 34.875,13.613 R26.2
NetC11_1: C11.1 R30.2 R31.1 | length 13.5
  Bottom Layer w0.8: R31.1 56.426,16.956 56.426,21.933 56.515,21.844 R30.2 56.565,21.614 60.961,26.01 C11.1
NetC11_2: C11.2 R35.2 R36.1 | length 14.9
  Bottom Layer w0.8: C11.2 65.889,27.813 R35.2@68.434,25.268 ; C11.2@64.461,27.644 C11.2@64.491,27.614 ; R36.1 68.859,16.892 69.209,17.242 69.209,17.292 70.638,18.722 70.638,23.342 69.462,24.518 69.184,24.518 R35.2
NetC12_1: C12.1 D6.2 H11.1 R31.2 | length 13.7
  Bottom Layer w0.8: R31.2 56.84,13.542 57.07,13.542 59.656,10.956 60.673,10.956 C12.1 61.05,10.554 61.05,7.658 D6.2 61.189,7.494 61.189,3.073 H11.1@61.316,2.946
NetC12_2: C12.2 D6.1 H11.2 R36.2 | length 13.3
  Bottom Layer w0.8: H11.2@63.729,2.946 63.729,3.148 64.388,3.807 D6.1@64.388,7.264 ; D6.1 64.375,7.658 64.375,10.554 C12.2 64.726,10.93 65.796,10.93 68.759,13.892 R36.2
NetC13_1: C13.1 R38.2 R39.1 | length 12.7
  Bottom Layer w0.8: R39.1 73.635,21.715 R38.2@73.685,21.765 ; R38.2 R38.2@73.685,21.765 ; C13.1 77.978,27.558 77.978,26.058 R38.2@73.685,21.765
NetC13_2: C13.2 R41.2 R42.1 | length 15.1
  Bottom Layer w0.8: C13.2 82.881,27.686 85.675,24.892 R41.2 85.775,24.892 87.63,23.037 87.63,18.62 85.877,16.867 R42.1
NetC14_1: C14.1 D7.2 H15.1 R39.2 | length 13.4
  Bottom Layer w0.8: R39.2 73.685,13.867 76.535,11.016 77.885,11.016 C14.1 78.322,10.554 D7.2@78.322,7.531 ; D7.2 D7.2@78.322,7.531 ; H15.1 78.715,5.543 78.585,5.673 78.585,7.268 D7.2@78.322,7.531
NetC14_2: C14.2 D7.1 H15.2 R42.2 | length 13
  Bottom Layer w0.8: H15.2 81.255,3.783 81.66,4.188 D7.1 81.647,7.531 81.647,10.554 C14.2 81.999,10.931 83.067,10.931 85.427,13.291 85.427,13.517 85.777,13.867 R42.2
NetH2_2: H2.2 R1.1 | length 4.9
  Top Layer w0.8: H2.2 10.353,50.739 10.353,55.433 R1.1
NetH6_2: H6.2 R7.1 | length 3.8
  Top Layer w0.8: H6.2 10.541,23.965 10.927,24.351 R7.1
NetH8_2: H8.2 R17.1 | length 3.8
  Top Layer w0.8: H8.2 27.689,23.752 27.689,27.557 R17.1
NetH10_2: H10.2 R29.1 | length 3.7
  Top Layer w0.8: H10.2 61.567,24.102 61.567,27.527 R29.1
NetH12_2: H12.2 R33.1 | length 5.2
  Top Layer w0.8: H12.2 78.75,50.607 78.75,55.682 R33.1
NetH13_2: H13.2 R34.1 | length 3.8
  Top Layer w0.8: H13.2 44.803,23.848 44.803,27.4 R34.1
NetH14_2: H14.2 R37.1 | length 3.8
  Top Layer w0.8: H14.2 78.588,25.876 78.61,25.899 78.61,27.425 R37.1
NetNPN_1_1: NPN_1.1 R4.2 | length 4.5
  Top Layer w0.8: NPN_1.1 9.343,41.673 10.081,42.41 R4.2
NetNPN_1_2: NPN_1.2 R5.1 | length 9.7
  Bottom Layer w0.8: NPN_1.2 17.507,47.066 17.507,48.164 17.857,48.514 R5.1
NetNPN_2_1: NPN_2.1 R10.2 | length 3.8
  Top Layer w0.8: NPN_2.1 9.144,14.749 10.057,15.662 R10.2
NetNPN_2_2: NPN_2.2 R11.1 | length 9.7
  Top Layer w0.8: NPN_2.2@11.557,14.478 NPN_2.2
  Bottom Layer w0.8: NPN_2.2 11.777,14.611 11.777,15.714 17.253,21.19 17.253,21.264 17.603,21.614 R11.1
NetNPN_3_1: NPN_3.1 R20.2 | length 4
  Top Layer w0.8: NPN_3.1 26.329,14.749 27.099,15.519 R20.2
NetNPN_3_2: NPN_3.2 R25.1 | length 9.8
  Bottom Layer w0.8: NPN_3.2 28.93,14.579 28.93,15.746 34.525,21.341 34.525,21.391 34.875,21.741 R25.1
NetNPN_4_1: NPN_4.1 R27.2 | length 4.1
  Top Layer w0.8: NPN_4.1 77.231,41.698 78.231,42.698 R27.2
NetNPN_4_2: NPN_4.2 R22.1 | length 9.6
  Bottom Layer w0.8: NPN_4.2 79.922,41.619 79.922,42.582 85.777,48.436 R22.1
NetNPN_5_1: NPN_5.1 R28.2 | length 3.9
  Top Layer w0.8: NPN_5.1 43.601,14.876 44.474,15.749 R28.2
NetNPN_5_2: NPN_5.2 R24.1 | length 9.5
  Bottom Layer w0.8: NPN_5.2 46.292,14.796 46.292,15.505 49.176,18.389 52.274,21.487 R24.1
NetNPN_6_1: NPN_6.1 R32.2 | length 4
  Top Layer w0.8: NPN_6.1 61.087,15.748 R32.2@61.087,18.341
NetNPN_6_2: NPN_6.2 R35.1 | length 9.8
  Bottom Layer w0.8: NPN_6.2 62.762,14.923 62.762,15.772 68.434,21.444 68.434,21.518 68.784,21.868 R35.1
NetNPN_7_1: NPN_7.1 R40.2 | length 4.1
  Top Layer w0.8: NPN_7.1 77.231,15.003 78.231,16.003 R40.2
NetNPN_7_2: NPN_7.2 R41.1 | length 9.6
  Bottom Layer w0.8: NPN_7.2 85.598,20.599 85.598,21.765 R41.1
RX0: ESP1.27 JP3.4 | length 5
  Top Layer w0.8: ESP1.27@58.293,63.754 JP3.4
RX2: ESP1.21 H1.2 JP3.10 | length 39.5
  Top Layer w0.8: ESP1.21@43.053,63.754 JP3.10
  Bottom Layer w0.8: H1.2 11.176,67.473 14.823,71.12 40.64,71.12 JP3.10
TX0: ESP1.28 JP3.3 | length 5
  Top Layer w0.8: ESP1.28@60.833,63.754 JP3.3
TX2: ESP1.22 H1.1 JP3.9 | length 39.6
  Top Layer w0.8: H1.1 17.78,71.374 42.926,71.374 JP3.9 ESP1.22@45.593,63.754
VIN: ESP1.15 JP5.1 | length 5.6
  Top Layer w0.8: JP5.1 ESP1.15@30.353,38.227
VN: ESP1.3 JP1.8 | length 5.6
  Top Layer w0.8: JP1.8 ESP1.3@60.833,38.227
VP: ESP1.2 JP1.9 | length 5.6
  Top Layer w0.8: JP1.9 ESP1.2@63.373,38.227

## Polygon pours and split planes (outlines as drawn)
GND on Bottom Layer "NONET_L-01_P-001" (solid, pour order 1): 0,73.025 90.043,73.025 90.067,73.001 90.067,-0.006 0.006,-0.006 0,0
GND on Top Layer "NONET_L-01_P-001" (solid, pour order 0): 0,73.025 90.043,73.025 90.043,0 0,0

## Keep-outs
Keep-Out Layer:
  the board outline again, w0.254

## Silkscreen, mask and mechanical layers (free items; w line width, h text height)
Top Overlay:
  text "5V" at 16.51,57.785 h1
  text "Mach dieu khien" at 29.683,48.86 h2.5
  text "+" at 23.114,0.762 h1.52